# Altium PCB PCB2.PcbDoc
Units mil, origin at the board's own origin, x right, y up, seen from the top; angles counter-clockwise.
Board outline 1455 x 2325 mil, 2 copper layers (Top Layer, Bottom Layer); 21 components, 11 nets, 54 pads, 9 vias.
Unrouted connection lines stored in the file: 4.
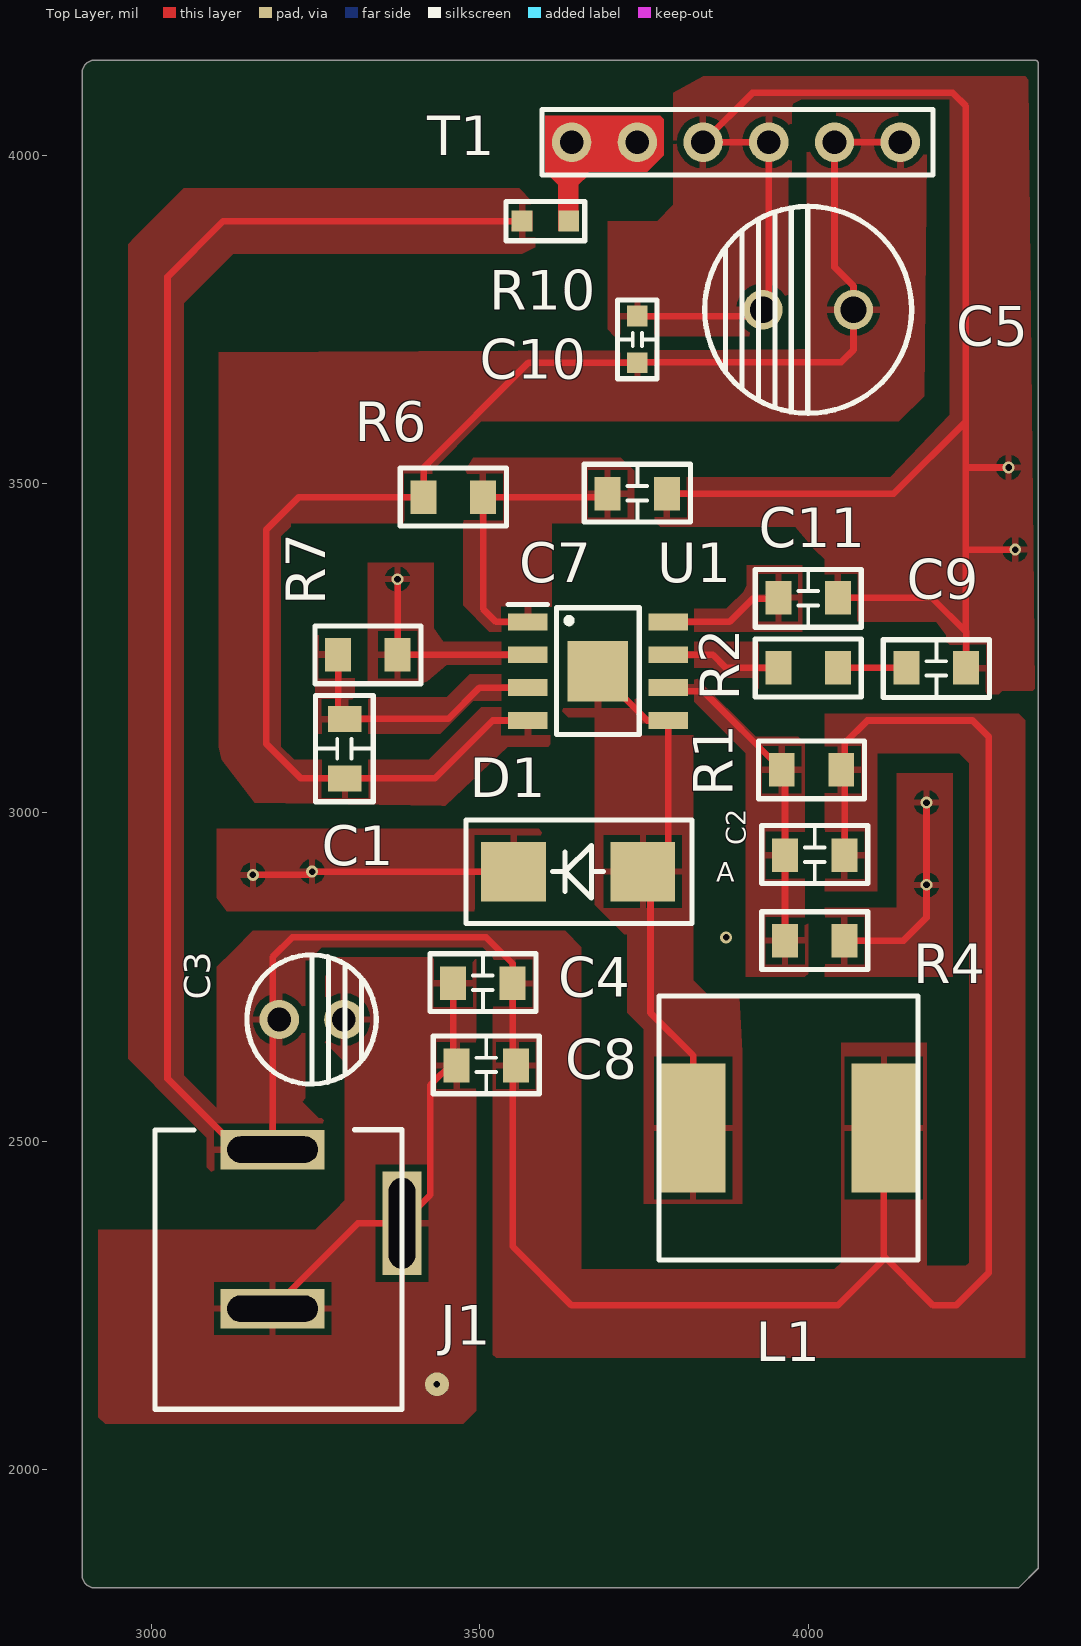
[diagram p0: Top Layer view]
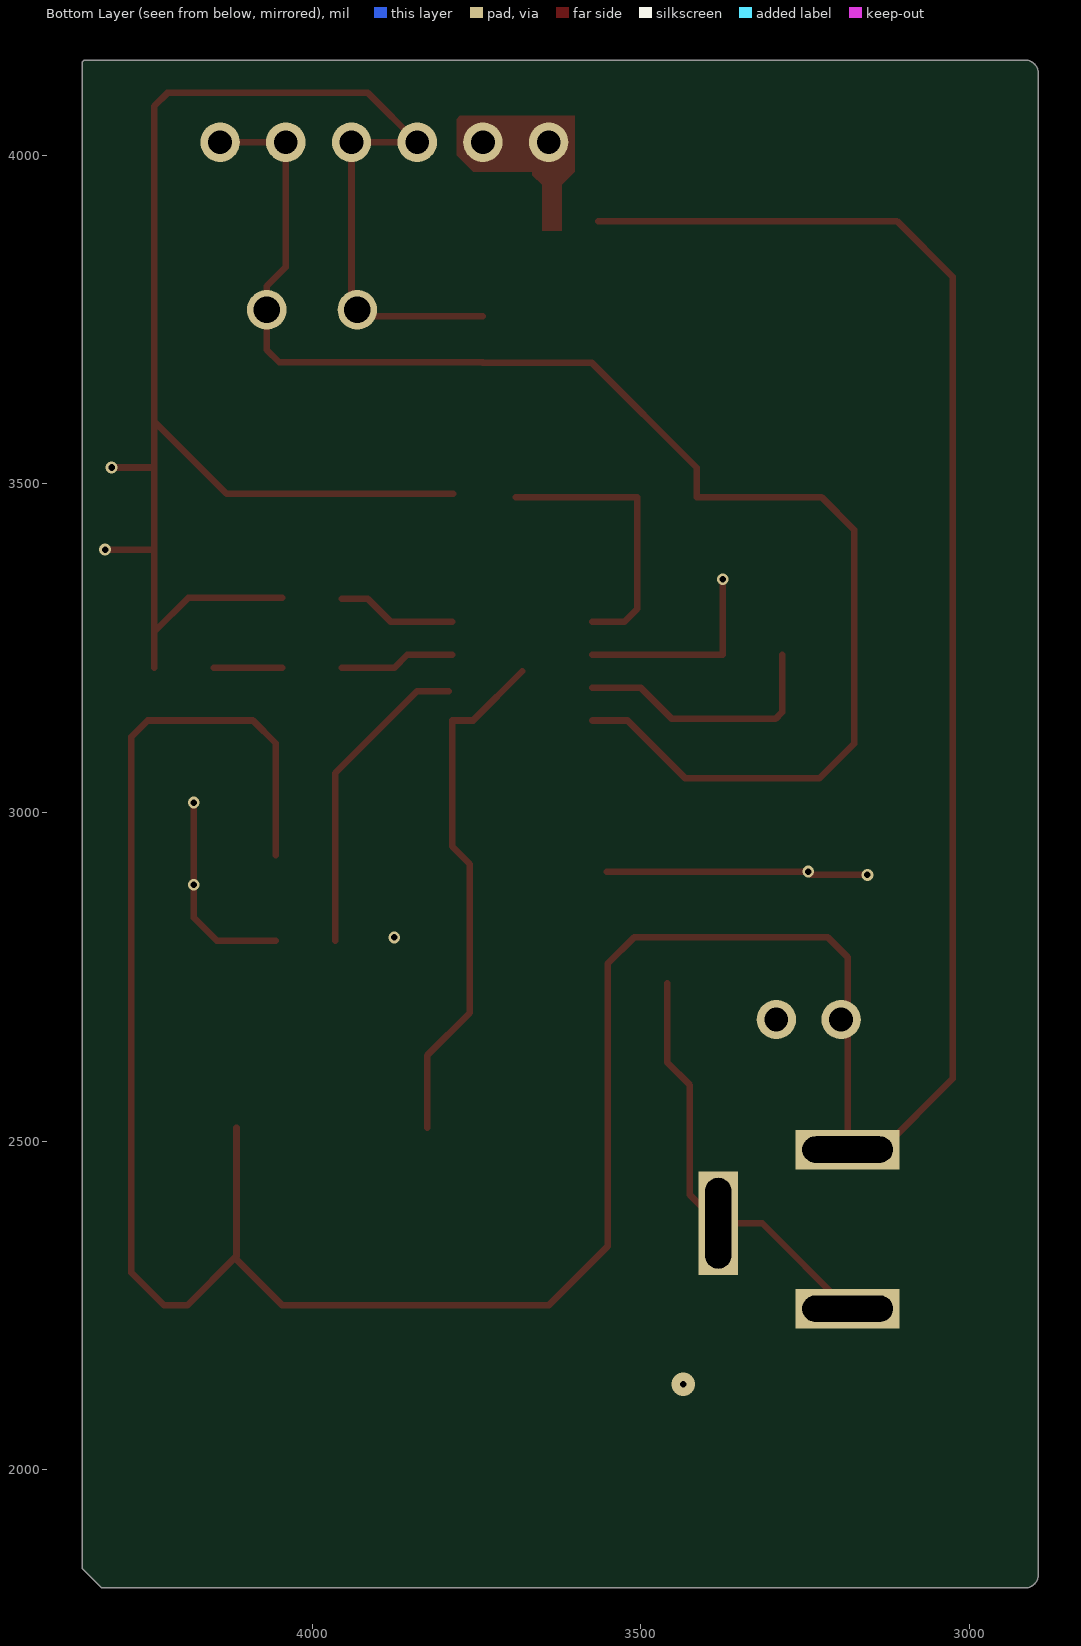
[diagram p1: Bottom Layer view, seen from below]
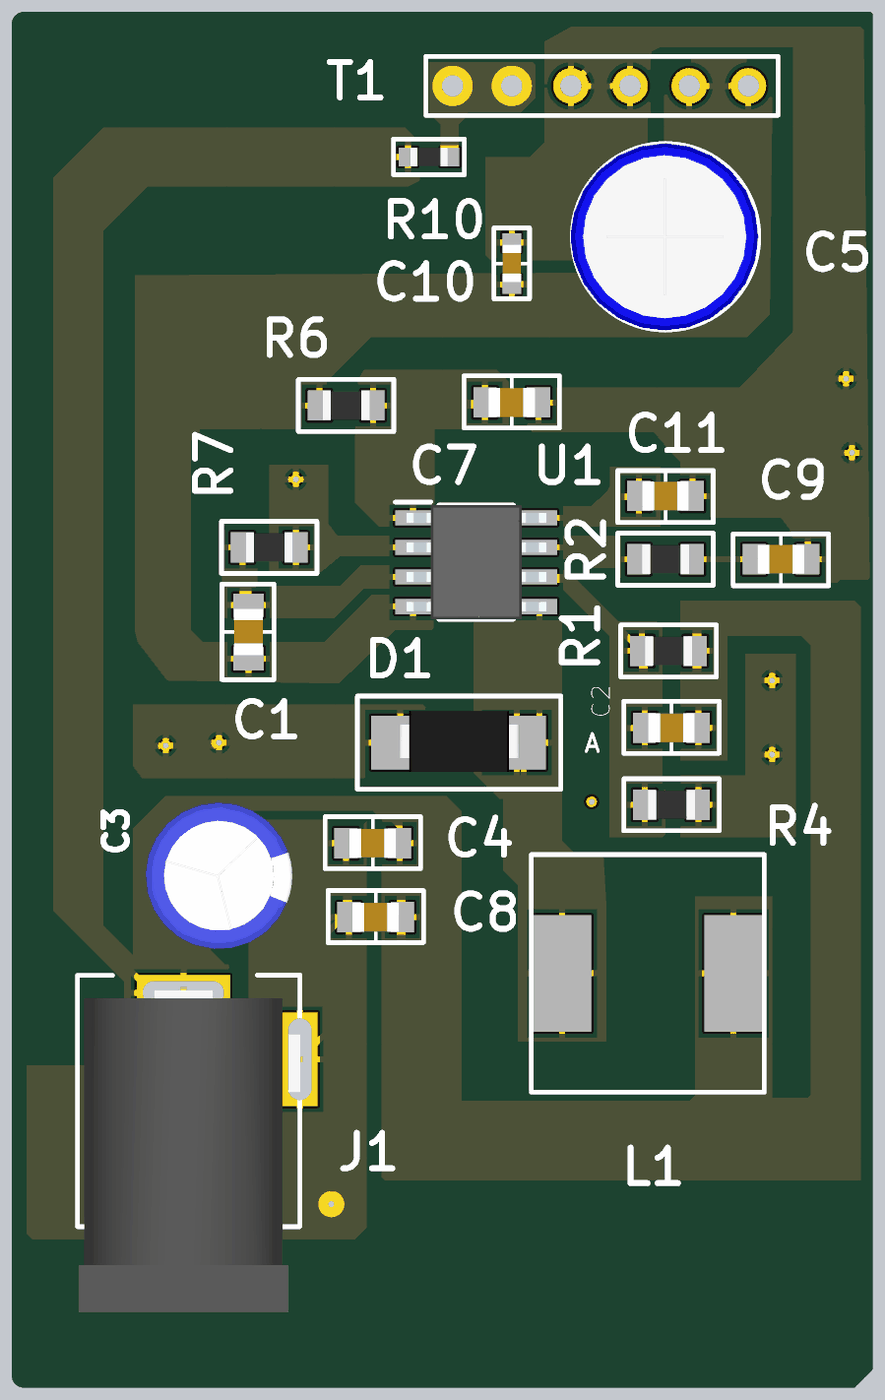
[diagram p2: 3D render of the assembled board from above, using the file's embedded part models]

## Layer stack, top to bottom
Top Solder: solder mask 0.4, Solder Resist, Dk 3.5
Top Layer: signal copper 1.4
Dielectric 1: dielectric 12.6, FR-4, Dk 4.8
Bottom Layer: signal copper 1.4
Bottom Solder: solder mask 0.4, Solder Resist, Dk 3.5

## Board outline
2895,1840 ccw(c2915,1840) 2915,1820 4320,1820 4350,1850 4350,4140 ccw(c4345,4140) 4345,4145 2915,4145 ccw(c2915,4125) 2895,4125

## Design rules (kind name [scope] priority, off if disabled: settings)
Clearance [All] p1: gap=10
HoleSize [All] p1: absolutevalues=TRUE maxlimit=150 minlimit=1 maxpercent=80.000 minpercent=20.000
PolygonConnect [All] p1: connectstyle=Relief reliefconductorwidth=10 reliefentries=4 polygonreliefangle="90 Angle" airgapwidth=10
RoutingVias [All] p1: holewidth=28 width=50 viastyle="Through Hole" minholewidth=28 minwidth=50 maxholewidth=28 maxwidth=50
SolderMaskExpansion [All] p1: expansion=4
Width [All] p1: maxlimit=10 minlimit=10 preferedwidth=10
29 further rules are at their usual default settings.

## Components (designator, comment, footprint, x,y, rotation, side; value= is the part's Value field where it differs from the comment)
C1 "1UF/100V" C_0805 3295,3097.1 r270 top
C2 "47pf/25v" C_0805 4010,2935 r180 top
C3 "47pf/100v" "CAP_ALLU 2.5mm" 3195,2685 r0 top
C4 "0.1uf/100v" C_0805 3505,2740 r180 top
C5 "47 uf/100v" "CAP_ALLU 3.5mm" 4000,3765 r180 top
C7 "0.1uf/100v" C_0805 3740,3485 r180 top
C8 "1.0uf/100v" C_0805 3510,2615 r180 top
C9 "47pf/25v" C_0805 4195,3220 r0 top
C10 "0.1 uf/100v" C_0603 3740,3720 r90 top
C11 "0.1uf/100v" C_0805 4000,3326.91 r0 top
D1 "DIODE" Diode_SMB 3650,2910 r180 top
J1 "CONN JACK PWR" "DC Power Socket" 3185,2245 r270 top
L1 "INDUCTOR IRON/SM" Inductor 3970,2520 r0 top
R1 "22k" R_0805 4005,3065 r180 top
R2 "2.2K" R_0805 4000,3220 r0 top
R4 "2K" R_0805 4010,2805 r0 top
R6 "100k" R_0805 3460,3480 r0 top
R7 "0R" R_0805 3330,3240 r0 top
R10 "0" R_0603 3600,3900 r0 top
T1 "1X3PIN" HDR1X6_2.54mm 4140,4020 r180 top
U1 "AX3162" SO8E 3680,3215 r0 top

## Footprints (in the part's own frame and the unit in brackets; to place one, negate y for a bottom-side part, rotate by r counter-clockwise, add the part's x,y. Pads: shape width x height; smd on the part's side, far side on the other; paste and mask are expansions set on the pad)
C_0603 [mm]
  rect 0.8x0.8 smd: 1(-0.9,0) 2(0.9,0)
  silkscreen extent -1.52,-0.76 1.52,0.76, body extent -0.8,-0.4 0.8,0.4, height 0.9
C_0805 [mm] "CAP SMD 0805"
  rect 1x1.3 smd: 1(-1.15,0) 2(1.15,0)
  silkscreen extent -2.05,-1.14 2.05,1.09, body extent -1,-0.62 1,0.63, height 1
"CAP_ALLU 2.5mm" [mil]
  round 60 hole 36: 1(0,0) 2(98.43,0)
  silkscreen extent -49,-98 148,98, body extent -74,-124 174,124, height 504
"CAP_ALLU 3.5mm" [mil]
  round 60 hole 40: 1(-68.9,0) 2(68.9,0)
  silkscreen extent -157,-157 157,157, body extent -157,-158 160,158, height 473
"DC Power Socket" [mil]
  rect 60x158 hole 40 slot 137.8 at 90 deg: 1(-242.13,0) 2(0,0)
  rect 158x60 hole 40 slot 137.8 at 0 deg: 3(-129.92,196.85)
  silkscreen extent -272,-179 153,197, body extent -246,-177 298,197, height 433
Diode_SMB [mm]
  rect 2.5x2.3 smd: 1(-2.5,0) 2(2.5,0)
  silkscreen extent -4.39,-2 4.34,2, body extent -2.62,-1.36 2.57,1.24, height 2.18
HDR1X6_2.54mm [mil] "Connector; Header; 6 Position"
  round 60 hole 36: 1(0,0) 2(100,0) 3(200,0) 4(300,0) 5(400,0) 6(500,0)
  silkscreen extent -50,-50 545,50
Inductor [mm] "Inductor 10.20 x 10"
  rect 2.5x5 smd: 1(-3.683,0) 2(3.683,0)
  silkscreen extent -5,-5.1 5,5.1, body extent -4.83,-4.95 4.83,4.95, height 5.1
R_0603 [mm] "RES SMD 0603"
  rect 0.8x0.8 smd: 1(-0.9,0) 2(0.9,0)
  silkscreen extent -1.52,-0.76 1.52,0.76, body extent -0.8,-0.4 0.8,0.4, height 0.4
R_0805 [mm] "RES SMD 0805"
  rect 1x1.3 smd: 1(-1.15,0) 2(1.15,0)
  silkscreen extent -2.05,-1.12 2.05,1.12, body extent -1,-0.62 1,0.63, height 0.5
SO8E [mm]
  rect 1.525x0.65 smd: 1(-2.712,1.905) 2(-2.712,0.635) 3(-2.712,-0.635) 4(-2.712,-1.905) 5(2.712,-1.905) 6(2.712,-0.635) 7(2.712,0.635) 8(2.712,1.905)
  rect 2.34x2.34 smd: 9(0,0)
  silkscreen extent -3.47,-2.45 1.6,2.58, body extent -3,-2.45 3,2.45, height 1.75

## Part data
C1 C2 C4 C7 C8 C9 C10 C11: library part C0603
C3 C5: library part CAP
R1 R2 R4 R6 R7 R10: library part RESISTOR

## Via types
v1: diameter 18, hole 10, Top Layer to Bottom Layer, 8 vias
v2: diameter 36, hole 10, Top Layer to Bottom Layer, 1 vias

## Nets (pads, with @x,y where several pads share a name; then routed paths per layer and width w, separated by ;. In a path a pad name is that pad's centre, name@x,y a point inside that pad or via, vN(x,y) a via of type N, cw(c..) or ccw(c..) an arc to the next point about the centre after c; other vN are vias at no path point)
12V: C2.1 C3.1 C4.1 C8.1 J1.1 L1.2 R1.1 R10.1 | length 5384.1
  Top Layer w10: R10.1 3110,3900 3025,3815 3025,2595 3132.87,2487.13 J1.1 3185,2780 3215,2810 3510,2810 3550.28,2769.72 C4.1 3550.28,2339.72 3640,2250 4045,2250 4115,2320 ; C2.1 4055.28,3105.28 4090,3140 4250,3140 4275,3115 4275,2300 4225,2250 4190,2250 4115,2325 L1.2
GND: C3.2 C4.2 C5.2 C7.1 C8.2 C9.2 C10.2 C11.2 D1.2 J1.2 J1.3 R4.2 R7.2 T1.3 T1.4 U1.2 | length 4378.7
  Top Layer w10: v1(3155,2905) 3240,2905 v1(3245,2910) D1.2 ; J1.2 3314.92,2374.92 J1.3 3425,2418.07 3425,2585.28 3459.72,2620 C4.2 ; v1(3375,3355) 3375.28,3354.72 R7.2 U1.2 ; C10.2 3921.54,3755.43 C5.2 3940,3773.9 T1.3 T1.4 3915,4095 4220,4095 4240,4075 4240,3595 ; C7.1 4130,3485 4240,3595 ; C11.2 4188.09,3326.91 4240,3275 ; R4.2 4145,2805 4180,2840 v1(4180,3015) ; C9.2 4240.28,3274.72 4240,3275 ; v1(4305,3525) 4240,3525 ; v1(4315,3400) 4240,3400 ; 4240,3275 4240,3400 ; 4240,3400 4240,3525 ; 4240,3525 4240,3595
  other v1: 4180,2890
  other v2: 3435,2130
NetC1_1: C1.1 R7.1 U1.3 | length 399.8
  Top Layer w10: R7.1 3284.72,3152.65 C1.1 3452.38,3142.38 3500,3190 U1.3
NetC2_2: C2.2 R1.2 R4.1 U1.6 | length 479.3
  Top Layer w10: U1.6@3792.05,3184.72 3840,3184.72 R1.2 3964.72,3060 C2.2 R4.1
NetC7_2: C7.2 R6.2 U1.1 | length 430.8
  Top Layer w10: U1.1 3525,3290 3505.28,3309.72 R6.2 C7.2@3689.72,3480
NetC9_1: C9.1 R2.2 | length 104.4
  Top Layer w10: R2.2 C9.1
NetC11_1: C11.1 U1.8 | length 182.5
  Top Layer w10: U1.8 3880,3290 3915,3325 C11.1@3954.72,3325
NetD1_1: D1.1 L1.1 U1.5 U1.9 | length 795.9
  Top Layer w10: U1.9 3755,3140 U1.5 3786.77,2948.35 3760,2921.57 3760,2695 3825,2630 L1.1
NetR2_1: R2.1 U1.7 | length 176.2
  Top Layer w10: U1.7 3855,3240 3875,3220 R2.1
NetR10_2: R10.2 T1.5 T1.6 | length 215.4
  Top Layer w10: R10.2@3640,3904.57 T1.6 T1.5
VIN: C1.2 C5.1 C10.1 R6.1 T1.1 T1.2 U1.4 | length 2243.2
  Top Layer w10: U1.4 3520,3140 3431.82,3051.82 C1.2 3228.18,3051.82 3175,3105 3175,3430 3225,3480 R6.1 3414.72,3524.72 3574.57,3684.57 C10.1 ; C10.1@3740,3685 4050,3685 4068.9,3703.9 C5.1 4068.9,3801.1 4040,3830 T1.2 T1.1
copper on no net:
  other v1: 3875,2810

## Polygon pours and split planes (outlines as drawn)
no net on Top Layer "NONET_L01_P000" (solid, pour order 0): 3580,3915 3580,3885 3550,3885 3550,3890
12V on Top Layer "12V_L01_P002" (solid, pour order 2): 3585,3910 3585,3925 3575,3935 3560,3950 3085,3950 3050,3950 2975,3875 2965,3865 2965,2630 2965,2625 3045,2545 3085,2505 3085,2500 3085,2460 3100,2445 3255,2445 3265,2445 3275,2455 3275,2515 3275,2520 3260,2535 3125,2535 3115,2535 3050,2600 3050,3775 3100,3825 3125,3850 3445,3850 3550,3850 3565,3850 3585,3860
GND on Top Layer "GND_L01_P008" (solid, pour order 8): 4010,3400 4025,3385 4025,3285 4030,3290 4175,3290 4195,3290 4210,3270 4210,3260 4210,3220 4210,3200 4210,3190 4215,3185 4220,3180 4225,3180 4290,3180 4295,3185 4345,3185 4335,4115 4330,4120 3840,4120 3795,4095 3795,3960 3795,3925 3775,3905 3770,3900 3695,3900 3695,3735 3700,3730 3705,3725 3970,3725 3970,3965 3975,3975 3975,4010 3975,4040 3975,4070 3976.67,4078.33 3990,4085 4215,4085 4215,3605 4125,3510 3940,3510 3755,3510 3755,3455 3765,3445 3775,3435 3980,3435
NetC7_2 on Top Layer "NETC7_2_L01_P010" (solid, pour order 10): 3475,3515 3475,3315 3515,3275 3610,3275 3610,3440 3735,3440 3735,3520 3725,3530 3715,3540 3490,3540
VIN on Top Layer "VIN_L01_P012" (solid, pour order 12): 3997.62,4065 4077.62,4065 4165.12,4065 4181.31,4053.69 4176.31,3633.69 4137.62,3595 4097.62,3595 3547.62,3595 3502.62,3595 3427.62,3520 3427.62,3435 3417.62,3435 3412.62,3440 3212.62,3440 3212.62,3435 3207.62,3430 3197.62,3420 3197.62,3105 3197.62,3100 3212.62,3085 3217.62,3080 3362.62,3080 3422.62,3080 3502.62,3160 3607.62,3160 3607.62,3100 3597.62,3100 3592.62,3100 3587.62,3100 3542.62,3100 3447.62,3010 3442.62,3010 3157.62,3015 3107.62,3080 3102.62,3100 3102.62,3265 3102.62,3445 3102.62,3601 3102.62,3700 3982.62,3705 3987.62,3705 3997.62,3705 3997.62,3715 3997.62,3745 3997.62,3900
GND on Top Layer "GND_L01_P014" (solid, pour order 14): 3540,3225 3605,3225 3605,3260 3590,3260 3515,3260 3445,3260 3430,3280 3430,3300 3430,3380 3375,3380 3330,3380 3330,3305 3330,3220 3330,3195 3355,3195 3360,3195 3395,3195 3410,3195 3420,3200 3450,3225
NetC1_1 on Top Layer "NETC1_1_L01_P016" (solid, pour order 16): 3310,3270 3310,3175 3450,3175 3455,3180 3485,3210 3520,3210 3600,3210 3605,3205 3605,3180 3605,3175 3600,3170 3495,3170 3490,3170 3450,3130 3440,3120 3250,3120 3250,3260 3250,3270 3260,3270 3290,3270
NetC11_1 on Top Layer "NETC11_1_L01_P018" (solid, pour order 18): 3751.16,3310 3751.16,3275 3991.16,3275 3991.16,3376.25 3906.16,3376.25 3906.16,3355 3906.16,3345 3901.16,3335 3896.16,3330 3884.81,3319.81 3875,3310 3865,3310 3826.16,3310 3791.16,3310
NetR2_1 on Top Layer "NETR2_1_L01_P020" (solid, pour order 20): 3750,3260 3750,3220 3835,3220 3855,3220 3860,3215 3870,3205 3910,3205 3915,3205 3920,3200 3920,3180 3995,3180 3995,3220 3995,3255 3995,3260 3775,3260
12V on Top Layer "12V_L01_P022" (solid, pour order 22): 4025,3150 4025,2880 4105,2880 4105,3090 4230,3090 4245,3075 4245,2315 4240,2310 4180,2310 4180,2610 4180,2650 4150,2650 4050,2650 4050,2315 4040,2305 3655,2305 3655,2795 3645,2805 3630,2820 3175,2820 3155,2820 3125,2790 3100,2765 3100,2445 3270,2445 3280,2455 3275,2460 3275,2520 3270,2520 3230,2560 3235,2565 3235,2775 3240,2775 3255,2790 3260,2795 3505,2795 3515,2785 3520,2780 3520,2600 3520,2175 3525,2170 4330,2170 4330,3140 4320,3150 4250,3150 4175,3150
GND on Top Layer "GND_L01_P024" (solid, pour order 24): 3265,2750 3265,2710 3255,2695 3255,2675 3255,2660 3270,2645 3295,2620 3295,2530 3295,2410 3280,2395 3250,2365 2920,2365 2920,2080 2930,2070 3445,2070 3475,2070 3480,2075 3495,2090 3495,2780 3280,2780 3275,2775
GND on Top Layer "GND_L01_P026" (solid, pour order 26): 4025,2855 4025,2750 4220,2750 4220,3060 4135,3060 4135,2855
NetC2_2 on Top Layer "NETC2_2_L01_P028" (solid, pour order 28): 4000,2835 4000,2755 3995,2750 3905,2750 3905,3065 3905,3090 3830,3165 3825,3170 3750,3170 3750,3210 3820,3210 3825,3210 3920,3115 3935,3115 3985,3115 3995,3105 3995,2840
NetD1_1 on Top Layer "NETD1_1_L01_P030" (solid, pour order 30): 3900,2635 3900,2405 3750,2405 3750,2670 3745,2675 3725,2695 3725,2815 3720,2815 3680,2855 3675,2860 3675,3145 3635,3145 3625,3155 3625,3260 3625,3265 3630,3270 3730,3270 3735,3265 3735,3180 3755,3160 3825,3160 3825,3115 3825,2745 3850,2720 3895,2720
GND on Top Layer "GND_L01_P032" (solid, pour order 32): 3100,2950 3100,2875 3100,2870 3115,2850 3600,2850 3615,2865 3610,2870 3610,2955 3595,2970 3590,2975 3100,2975

## Other copper
Top Layer:
  region net NetR10_2: 3755,3975 3780,4000 3780,4055 3775,4060 3600,4060 3600,3975 3620,3955 3620,3885 3650,3885 3650,3955 3665,3970 3665,3975

## Silkscreen, mask and mechanical layers (free items; w line width, h text height)
Mechanical 1:
  lines w10: 2895,1840 ccw(c2915,1840) 2915,1820 4320,1820 4350,1850 4350,4140 ccw(c4345,4140) 4345,4145 3010,4145 2915,4145 ccw(c2915,4125) 2895,4125 2895,1840

## Text inside footprints (layer, text, board x,y; h text height)
D1: Top Overlay "A" at 3860,2895 h30